# Altium PCB pcb.PcbDoc (part 1 of 2)
Units mil, origin at the board's own origin, x right, y up, seen from the top; angles counter-clockwise.
Board outline 3942.98 x 2092.58 mil, 2 copper layers (Top Layer, Bottom Layer), stack 62.205 mil thick; 140 components, 132 nets, 587 pads, 237 vias.
Unrouted connection lines stored in the file: 2.
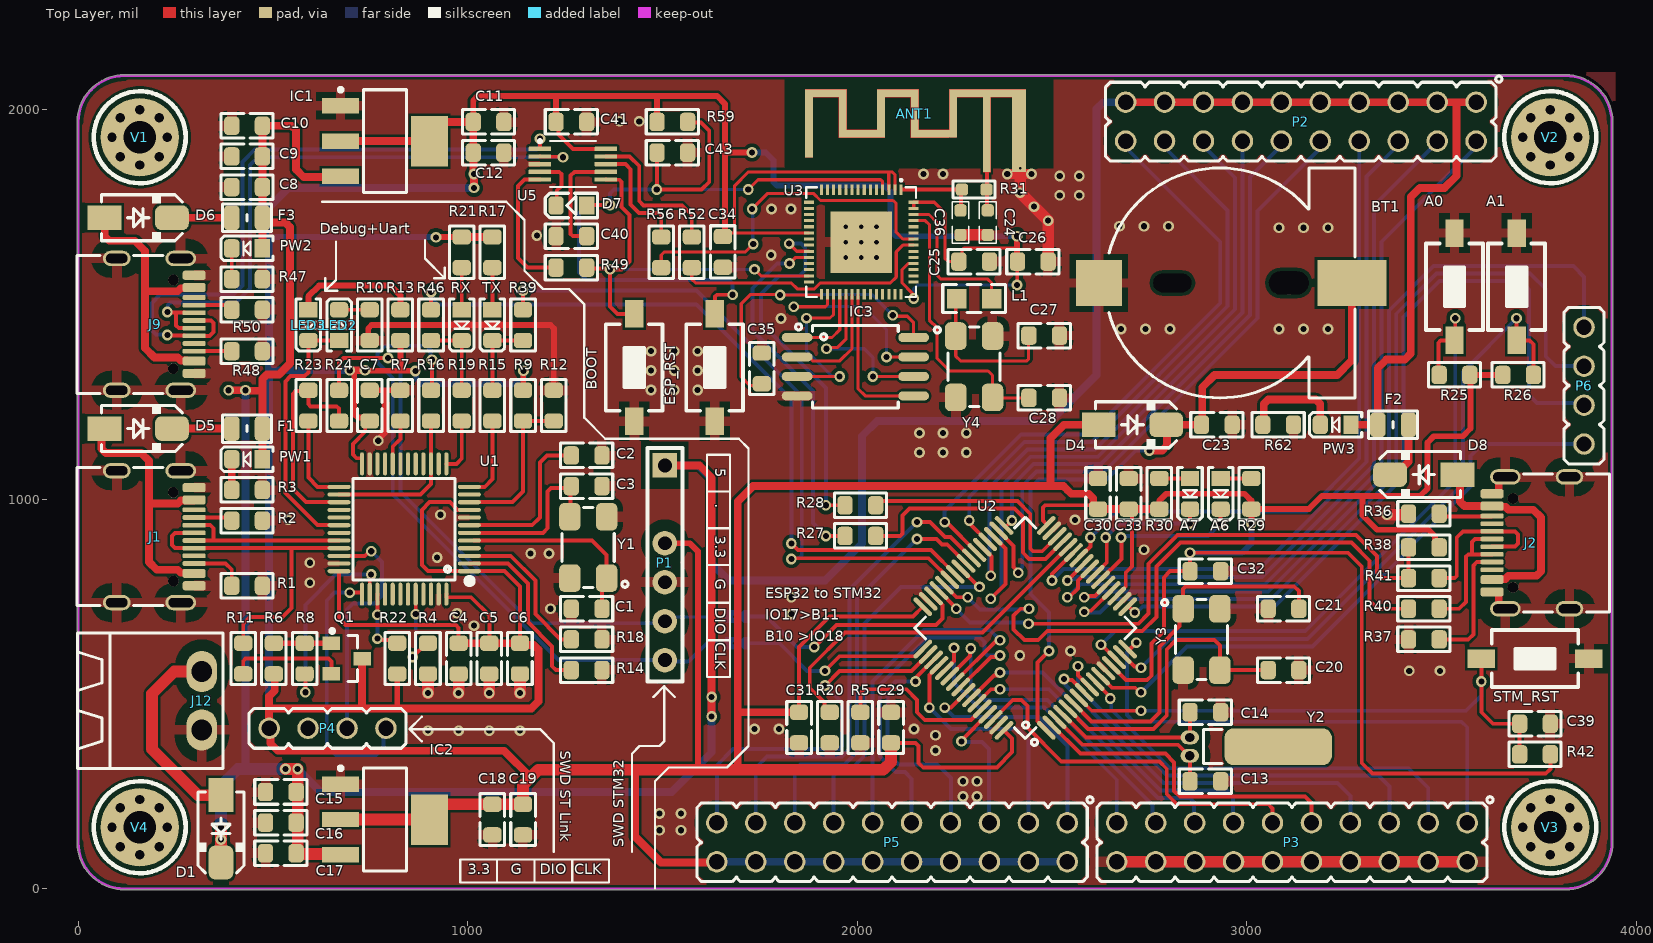
[diagram p0: Top Layer view]
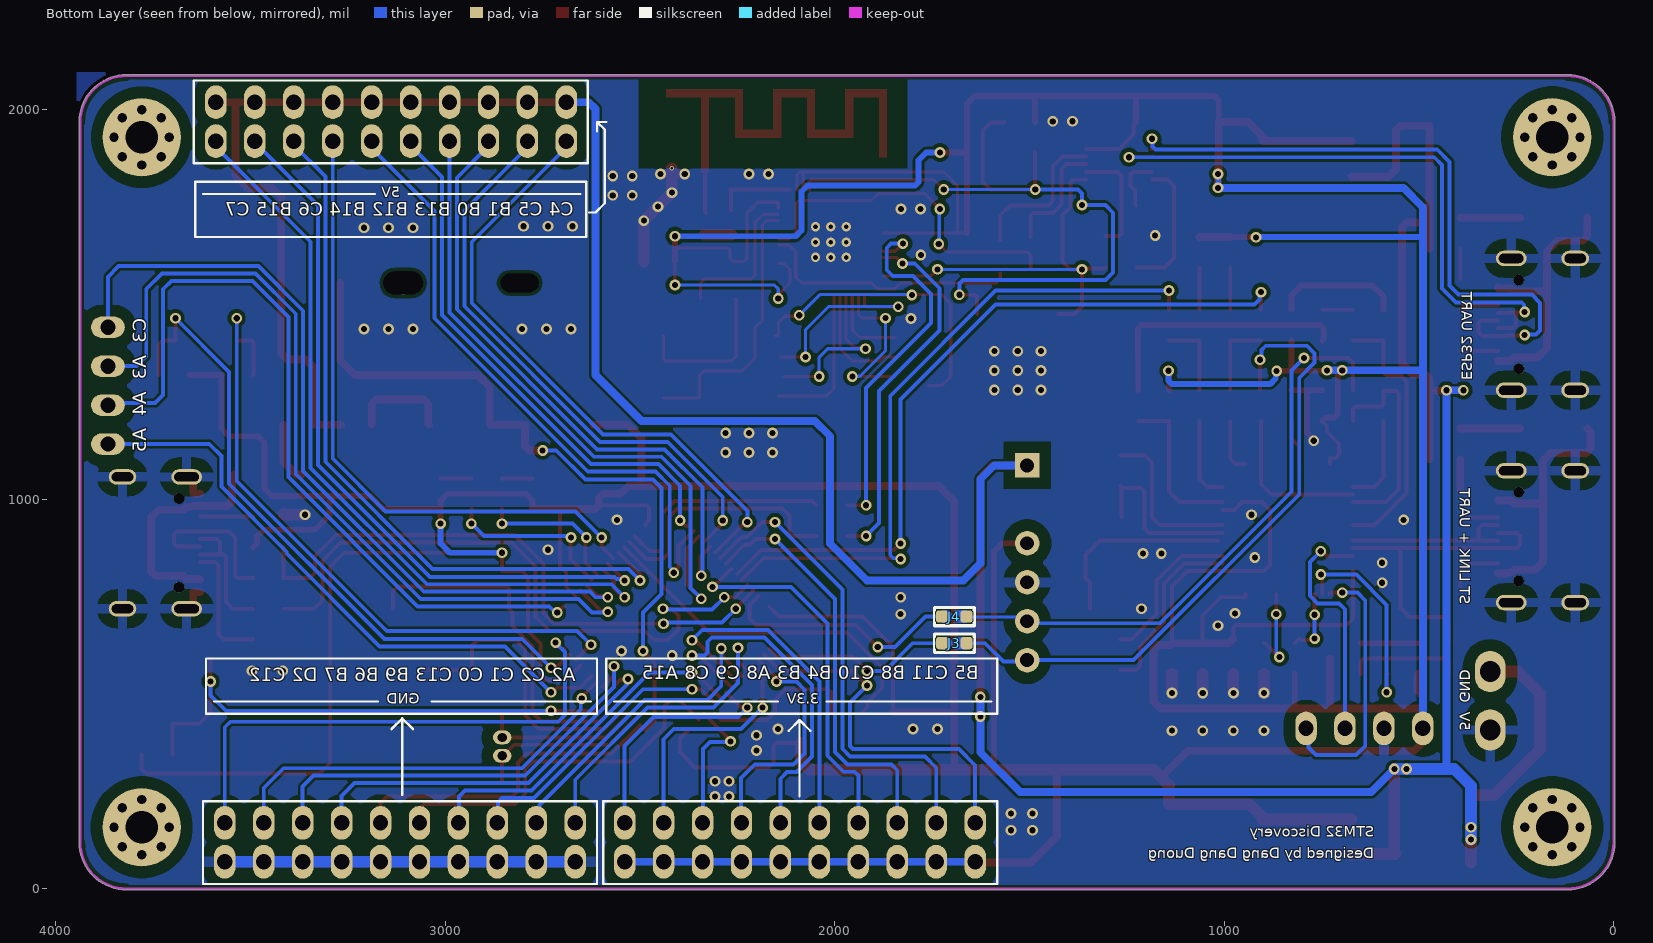
[diagram p1: Bottom Layer view, seen from below]

## Layer stack, top to bottom
Top Solder: solder mask 0.3937, Solder Resist, Dk 3.5
Top Layer: signal copper 1.378
Dielectric 1: dielectric 59.4488, FR-4, Dk 4.8
Bottom Layer: signal copper 1.378
Bottom Solder: solder mask 0.3937, Solder Resist, Dk 3.5

## Board outline
-2.97,118.42 -2.97,1968.19 -2.98,1968.5 cw(c118.11,1968.5) 118.11,2089.6 1722.44,2089.6 1722.75,2089.58 3818.59,2089.58 3818.9,2089.6 cw(c3818.9,1968.5) 3939.99,1968.5 3939.99,118.11 cw(c3818.9,118.11) 3818.9,-2.98 3818.59,-2.97 118.42,-2.97 118.11,-2.98 cw(c118.11,118.11)

## Design rules (kind name [scope] priority, off if disabled: settings)
Clearance "Schematic Clearance Constraint_4" [InComponent('J3')] p1: gap=10 ignorepadtopadclearanceinfootprint=FALSE except(0: Arc-Hole Track-Hole SMDPad-Hole THPad-Hole Via-Hole Fill-Hole Poly-Hole Region-Hole Text-Hole; 5: Region-Region)
Clearance "Schematic Clearance Constraint_3" [InComponent('J4')] p2: gap=10 ignorepadtopadclearanceinfootprint=FALSE except(0: Arc-Hole Track-Hole SMDPad-Hole THPad-Hole Via-Hole Fill-Hole Poly-Hole Region-Hole Text-Hole; 5: Region-Region)
Clearance "Schematic Clearance Constraint_2" [InComponent('J9')] p3: gap=10 ignorepadtopadclearanceinfootprint=TRUE except(0: Arc-Hole Track-Hole SMDPad-Hole THPad-Hole Via-Hole Fill-Hole Poly-Hole Region-Hole Text-Hole; 5: Arc-Arc Arc-Track Arc-SMDPad Arc-THPad Track-Track Track-SMDPad Track-THPad SMDPad-SMDPad SMDPad-THPad SMDPad-Fill SMDPad-Poly SMDPad-Region)
Clearance "Schematic Clearance Constraint_1" [InComponent('J2')] p4: gap=10 ignorepadtopadclearanceinfootprint=TRUE except(0: Arc-Hole Track-Hole SMDPad-Hole THPad-Hole Via-Hole Fill-Hole Poly-Hole Region-Hole Text-Hole; 5: Arc-Arc Arc-Track Arc-SMDPad Arc-THPad Track-Track Track-SMDPad Track-THPad SMDPad-SMDPad SMDPad-THPad SMDPad-Fill SMDPad-Poly SMDPad-Region)
Clearance "Schematic Clearance Constraint" [InComponent('J1')] p5: gap=10 ignorepadtopadclearanceinfootprint=TRUE except(0: Arc-Hole Track-Hole SMDPad-Hole THPad-Hole Via-Hole Fill-Hole Poly-Hole Region-Hole Text-Hole; 5: Arc-Arc Arc-Track Arc-SMDPad Arc-THPad Track-Track Track-SMDPad Track-THPad SMDPad-SMDPad SMDPad-THPad SMDPad-Fill SMDPad-Poly SMDPad-Region)
Clearance Clearance_1 [InNetClass('USB')] p6: gap=10 ignorepadtopadclearanceinfootprint=TRUE except(7.99: Track-Track Track-SMDPad; 30: THPad-Poly)
Clearance [All] p7: gap=10 ignorepadtopadclearanceinfootprint=TRUE except(5: Track-Track Track-SMDPad; 7: Track-THPad Track-Via Track-Fill Track-Poly Track-Region Track-Text Track-Hole SMDPad-SMDPad SMDPad-THPad SMDPad-Via SMDPad-Fill SMDPad-Poly SMDPad-Region SMDPad-Text SMDPad-Hole; 9: Poly-Poly Poly-Region Poly-Text Poly-Hole Region-Region Region-Text Region-Hole; 30: THPad-Poly)
Height [All] p1: minheight=0 maxheight=1574.8 prefheight=500
HoleSize [All] p1: absolutevalues=TRUE maxlimit=236.22 minlimit=3.94 maxpercent=80.000 minpercent=20.000
MinimumSolderMaskSliver [All] p1: minsoldermaskwidth=1
PlaneConnect [All] p1: planeconnectstyle=Relief reliefexpansion=20 reliefentries=4 reliefconductorwidth=35 reliefairgap=10
PolygonConnect [All] p1: thpad.connectstyle=Relief thpad.reliefconductorwidth=25 thpad.reliefentries=4 thpad.polygonreliefangle="90 Angle" thpad.airgapwidth=30 smdpad.connectstyle=Relief smdpad.reliefconductorwidth=25 smdpad.reliefentries=4 smdpad.polygonreliefangle="90 Angle" smdpad.airgapwidth=15 via.connectstyle=Relief via.reliefconductorwidth=25 via.reliefentries=4 via.polygonreliefangle="90 Angle" via.airgapwidth=0
RoutingVias [All] p1: holewidth=15.75 width=27.56 viastyle="Through Hole" minholewidth=15.75 minwidth=27.56 maxholewidth=15.75 maxwidth=27.56
SilkToSilkClearance [All] p1: silktosilkclearance=1
SilkToSolderMaskClearance [IsPad] p1: minsilkscreentomaskgap=0 clearancetoexposedcopper=TRUE
SolderMaskExpansion [All] p1: expansion=4 istentingtop=FALSE
SupplyNets "Schematic Supply Nets_2" [InNet('GND')] p1: voltage=0.000
SupplyNets "Schematic Supply Nets_1" [InNet('5V')] p2: voltage=0.000
SupplyNets "Schematic Supply Nets" [InNet('3.3V')] p3: voltage=0.000
UnRoutedNet [All] p1: checkbadconnections=TRUE
Width [All] p1: maxlimit=50 minlimit=7 preferedwidth=10
23 further rules are at their usual default settings.

## Components (designator, comment, footprint, x,y, rotation, side; value= is the part's Value field where it differs from the comment)
A0 "SW-SMD" "SW-SMD 3x6 mm" 3533.46,1545.28 r270 top
A1 "SW-SMD" "SW-SMD 3x6 mm" 3692.91,1545.28 r270 top
A6 "LED BLUE" "LED 0805 Blue" 2933.07,1013.78 r270 top
A7 "LED GREEN" "LED 0805 Green" 2854.33,1013.78 r270 top
ANT1 "2.4 GHz PCB" "2.4 GHZ PCB ANTENA" 2153.54,1952.76 r180 top
BOOT "SW-SMD" "SW-SMD 3x6 mm" 1427.17,1337.95 r270 top
BT1 "CR1220" BTH1220 2982.28,1555.12 r180 top
C1 "10pF" C_0805_SMD 1305.12,718.5 r180 top
C2 "104" C_0805_SMD 1305.12,1112.2 r0 top
C3 "10pF" C_0805_SMD 1305.12,1033.46 r180 top
C4 "104" C_0805_SMD 976.38,590.55 r270 top
C5 "104" C_0805_SMD 1055.12,590.55 r270 top
C6 "104" C_0805_SMD 1133.86,590.55 r270 top
C7 "104" C_0805_SMD 748.03,1240.16 r90 top
C8 "104" C_0805_SMD 433.07,1801.18 r180 top
C9 "10uF/25V" C_0805_SMD 433.07,1879.92 r0 top
C10 "10uF/25V" C_0805_SMD 433.07,1958.66 r0 top
C11 "104" C_0805_SMD 1053.15,1968.5 r0 top
C12 "10uF/25V" C_0805_SMD 1053.15,1889.76 r180 top
C13 "10pF" C_0805_SMD 2893.7,275.59 r180 top
C14 "10pF" C_0805_SMD 2893.7,452.76 r180 top
C15 "104" C_0805_SMD 519.68,248.03 r180 top
C16 "10uF/25V" C_0805_SMD 519.68,169.29 r0 top
C17 "10uF/25V" C_0805_SMD 519.68,90.55 r0 top
C18 "104" C_0805_SMD 1062.99,177.17 r270 top
C19 "10uF/25V" C_0805_SMD 1141.73,177.17 r90 top
C20 "10pF" C_0805_SMD 3094.49,561.02 r0 top
C21 "10pF" C_0805_SMD 3094.49,718.5 r180 top
C23 "10uF/25V" C_0805_SMD 2923.23,1190.94 r180 top
C24 "2.2uF" C_0603_SMD 2335,1710 r90 top
C25 "104" C_0805_SMD 2300,1610 r180 top
C26 "104" C_0805_SMD 2450.63,1610 r180 top
C27 "10pF" C_0805_SMD 2480,1420 r0 top
C28 "10pF" C_0805_SMD 2480,1260 r0 top
C29 "104" C_0805_SMD 2086.61,413.39 r270 top
C30 "104" C_0805_SMD 2618.11,1013.78 r270 top
C31 "104" C_0805_SMD 1850.39,413.39 r90 top
C32 "104" C_0805_SMD 2893.7,814.96 r180 top
C33 "104" C_0805_SMD 2696.85,1013.78 r270 top
C34 "104" C_0805_SMD 1655,1635 r90 top
C35 "104" C_0805_SMD 1755,1335.63 r270 top
C36 "2.2uF" C_0603_SMD 2265,1710 r90 top
C39 "104" C_0805_SMD 3740.16,423.23 r180 top
C40 "104" C_0805_SMD 1265.75,1675.2 r0 top
C41 "104" C_0805_SMD 1265.75,1968.5 r180 top
C43 "1uF/50V" C_0805_SMD 1525,1889.76 r180 top
D1 "SS34" D_SMA 366.14,153.54 r270 top
D4 "SS34" D_SMA 2706.69,1190.94 r0 top
D5 "SS34" D_SMA 153.54,1181.1 r0 top
D6 "SS34" D_SMA 153.54,1722.44 r0 top
D7 "1N4148" D_SOD323 1265.75,1753.94 r180 top
D8 "SS34" D_SMA 3454.72,1062.99 r180 top
ESP_RST "SW-SMD" "SW-SMD 3x6 mm" 1633.86,1337.95 r270 top
F1 "0805L050WR" F0805 433.07,1181.1 r0 top
F2 "0805L050WR" F0805 3375.98,1190.94 r180 top
F3 "0805L050WR" F0805 433.07,1722.44 r0 top
IC1 "AMS1117" SOT223-4N 787.4,1919.29 r0 top
IC2 "AMS1117" SOT223-4N 787.4,177.17 r0 top
IC3 "W25Q128JV" SO_8_W 1995,1340 r0 top
J1 "USB C 3.1" USBC_SMD_16_USB4105 287.4,903.54 r90 top
J2 "USB C 3.1" USBC_SMD_16_USB4105 3639.76,887.8 r270 top
J3 "Jump" JP_0603 1692.91,630.18 r0 bottom
J4 "Jump" JP_0603 1692.91,698.45 r0 bottom
J9 "USB C 3.1" USBC_SMD_16_USB4105 287.4,1448.82 r90 top
J12 "KF3.81-2P" "CONN KF-3.81-2-R" 187.01,482.28 r90 top
L1 "4.7uH" "L 0805" 2300,1515 r180 top
LED2 "LED BLUE" "LED 0805 Blue" 669.29,1446.85 r90 top
LED3 "LED GREEN" "LED 0805 Green" 590.55,1446.85 r270 top
P1 "Nuvoton" "Header Code Nuvoton 2.54 6P" 1505.91,836.61 r270 top
P2 "HDR-M-2x10" HDR_M_2X10 3138.98,1969.29 r180 top
P3 "HDR-M-2x10" HDR_M_2X10 3116.14,118.9 r180 top
P4 "HDR-M-4P" HDR_M_1X4 639.76,411.42 r180 top
P5 "HDR-M-2x10" HDR_M_2X10 2089.37,118.9 r180 top
P6 "HDR-M-4P" HDR_M_1X4 3866.14,1291.34 r90 top
PW1 "LED RED" "LED 0805 Red" 433.07,1102.36 r180 top
PW2 "LED RED" "LED 0805 Red" 433.07,1643.7 r180 top
PW3 "LED RED" "LED 0805 Red" 3228.35,1190.94 r180 top
Q1 "3904" "SOT23_N NXP" 688.98,590.55 r0 top
R1 "5.1K" RES-SMD-0805 433.07,777.56 r0 top
R2 "5.1K" RES-SMD-0805 433.07,944.88 r0 top
R3 "10K" RES-SMD-0805 433.07,1023.62 r0 top
R4 "10K" RES-SMD-0805 897.64,590.55 r270 top
R5 "10K" RES-SMD-0805 2007.87,413.39 r270 top
R6 "10K" RES-SMD-0805 501.97,590.55 r90 top
R7 "10K" RES-SMD-0805 826.77,1240.16 r90 top
R8 "100R" RES-SMD-0805 580.71,590.55 r270 top
R9 "5.1K" RES-SMD-0805 1141.73,1240.16 r90 top
R10 "5.1K" RES-SMD-0805 748.03,1446.85 r270 top
R11 "1.5k" RES-SMD-0805 423.23,590.55 r90 top
R12 "5.1K" RES-SMD-0805 1220.47,1240.16 r90 top
R13 "5.1K" RES-SMD-0805 826.77,1446.85 r270 top
R14 "10K" RES-SMD-0805 1305.12,561.02 r0 top
R15 "33R" RES-SMD-0805 1062.99,1240.16 r270 top
R16 "33R" RES-SMD-0805 905.51,1240.16 r270 top
R17 "5.1K" RES-SMD-0805 1062.99,1633.86 r270 top
R18 "10K" RES-SMD-0805 1305.12,639.76 r0 top
R19 "33R" RES-SMD-0805 984.25,1240.16 r270 top
R20 "10K" RES-SMD-0805 1929.13,413.39 r270 top
R21 "5.1K" RES-SMD-0805 984.25,1633.86 r270 top
R22 "10K" RES-SMD-0805 818.9,590.55 r270 top
R23 "100R" RES-SMD-0805 590.55,1240.15 r270 top
R24 "33R" RES-SMD-0805 669.29,1240.16 r270 top
R25 "4.7K" RES-SMD-0805 3533.46,1318.9 r180 top
R26 "4.7K" RES-SMD-0805 3696.85,1318.9 r0 top
R27 "33R" RES-SMD-0805 2007.87,905.51 r0 top
R28 "33R" RES-SMD-0805 2007.87,984.25 r0 top
R29 "2.2k" RES-SMD-0805 3011.81,1013.78 r90 top
R30 "2.2k" RES-SMD-0805 2775.59,1013.78 r90 top
R31 "1M" RES-SMD-0603 2300,1795 r0 top
R36 "5.1K" RES-SMD-0805 3454.73,962.6 r180 top
R37 "5.1K" RES-SMD-0805 3454.72,639.76 r180 top
R38 "1.5k" RES-SMD-0805 3454.72,875.98 r180 top
R39 "33R" RES-SMD-0805 1141.73,1446.85 r270 top
R40 "33R" RES-SMD-0805 3454.72,718.5 r0 top
R41 "33R" RES-SMD-0805 3454.72,797.24 r0 top
R42 "4.7K" RES-SMD-0805 3740.16,344.49 r180 top
R46 "33R" RES-SMD-0805 905.51,1446.85 r90 top
R47 "10K" RES-SMD-0805 433.07,1564.96 r0 top
R48 "5.1K" RES-SMD-0805 433.07,1486.22 r180 top
R49 "33R" RES-SMD-0805 1265.75,1594.49 r180 top
R50 "5.1K" RES-SMD-0805 433.07,1379.92 r180 top
R52 "499R" RES-SMD-0805 1575.43,1633.86 r90 top
R56 "499R" RES-SMD-0805 1496.69,1633.86 r90 top
R59 "10K" RES-SMD-0805 1525,1968.5 r180 top
R62 "10K" RES-SMD-0805 3080.71,1190.94 r0 top
RX "LED BLUE" "LED 0805 Blue" 984.25,1446.85 r270 top
STM_RST "SW-SMD" "SW-SMD 3x6 mm" 3740.16,590.55 r180 top
TX "LED GREEN" "LED 0805 Green" 1062.99,1446.85 r270 top
U1 "STM32F103CBT6" LQFP-48_L7.0-W7.0-P0.50-LS9.0-BL 836.61,923.23 r90 top
U2 "STM32F103RCT6" QFG50_64 2431.1,669.29 r135 top
U3 "ESP32-S3(R8)" QFN-56_L7.0-W7.0-P0.40-TL-EP4.0 2010,1660 r270 top
U5 "CH340X" VSSOP-10 1269.69,1860.24 r0 top
V1 "Vit m2" "Screw 2mm - VIA" 157.48,1929.13 r0 top locked
V2 "Vit m2" "Screw 2mm - VIA" 3779.53,1929.13 r0 top locked
V3 "Vit m2" "Screw 2mm - VIA" 3779.53,157.48 r0 top locked
V4 "Vit m2" "Screw 2mm - VIA" 157.48,157.48 r0 top locked
Y1 "8Mhz" XTL_4_5032 1309.05,875.98 r180 top
Y2 "32.768kHz" XTLT_RTC 2853.83,364.62 r270 top
Y3 "8Mhz" XTL_4_5032 2883.86,639.76 r0 top
Y4 "20Mhz" XTL_4_5032 2300,1340 r0 top

## Footprints (in the part's own frame and the unit in brackets; to place one, negate y for a bottom-side part, rotate by r counter-clockwise, add the part's x,y. Pads: shape width x height; smd on the part's side, far side on the other; paste and mask are expansions set on the pad)
"2.4 GHZ PCB ANTENA" [mm]
  rect 5x0.5 smd paste+0.102: 1(-4.6,-2.275)
  rect 0.5x4.9 smd paste+0.102: 1(-4.55,0.425)
  rect 0.5x2.64 smd paste+0.102: 1(-2.35,-0.705) 1(0.15,-0.705) 1(2.35,-0.705) 1(4.85,-0.705)
  rect 2x0.5 smd paste+0.102: 1(-1.1,0.365) 1(3.6,0.365)
  rect 2.7x0.5 smd paste+0.102: 1(1.25,-2.275) 1(5.95,-2.275)
  rect 0.5x3.94 smd paste+0.102: 1(7.05,-0.055)
  rect 0.9x4.9 smd paste+0.102: 2(-6.65,0.425)
  Top Layer region: -2.1,-2.025 -2.1,-2.525 -7.1,-2.525 -7.1,-2.025 -4.8,-2.025 -4.8,2.875 -4.3,2.875 -4.3,-2.025 -2.6,-2.025 -2.6,0.615 -2.1,0.615 -2.1,0.615 -0.1,0.615 -0.1,0.115 -2.1,0.115 -2.1,-2.025
  Top Layer region: -2.1,-2.025 -2.1,-2.525 -7.1,-2.525 -7.1,-2.025 -4.8,-2.025 -4.8,2.875 -4.3,2.875 -4.3,-2.025 -2.6,-2.025 -2.6,0.615 -2.1,0.615 -2.1,0.615 -0.1,0.615 -0.1,0.115 -2.1,0.115 -2.1,-2.025
  Top Layer region: -2.1,-2.025 -2.1,-2.525 -7.1,-2.525 -7.1,-2.025 -4.8,-2.025 -4.8,2.875 -4.3,2.875 -4.3,-2.025 -2.6,-2.025 -2.6,0.615 -2.1,0.615 -2.1,0.615 -0.1,0.615 -0.1,0.115 -2.1,0.115 -2.1,-2.025
  Top Layer region: -2.1,-2.025 -2.1,-2.525 -7.1,-2.525 -7.1,-2.025 -4.8,-2.025 -4.8,2.875 -4.3,2.875 -4.3,-2.025 -2.6,-2.025 -2.6,0.615 -2.1,0.615 -2.1,0.615 -0.1,0.615 -0.1,0.115 -2.1,0.115 -2.1,-2.025
  Top Layer region: -2.1,-2.025 -2.1,-2.525 -7.1,-2.525 -7.1,-2.025 -4.8,-2.025 -4.8,2.875 -4.3,2.875 -4.3,-2.025 -2.6,-2.025 -2.6,0.615 -2.1,0.615 -2.1,0.615 -0.1,0.615 -0.1,0.115 -2.1,0.115 -2.1,-2.025
  Top Layer region: 2.6,-2.025 2.6,-2.525 -0.1,-2.525 -0.1,-2.025 -0.1,0.615 0.4,0.615 0.4,-2.025 2.1,-2.025 2.1,0.615 2.6,0.615 2.6,0.615 4.6,0.615 4.6,0.115 2.6,0.115 2.6,-2.025
  Top Layer region: 2.6,-2.025 2.6,-2.525 -0.1,-2.525 -0.1,-2.025 -0.1,0.615 0.4,0.615 0.4,-2.025 2.1,-2.025 2.1,0.615 2.6,0.615 2.6,0.615 4.6,0.615 4.6,0.115 2.6,0.115 2.6,-2.025
  Top Layer region: 7.3,-2.025 7.3,-2.525 4.6,-2.525 4.6,-2.025 4.6,-2.025 4.6,0.615 5.1,0.615 5.1,-2.025 6.8,-2.025 6.8,1.915 7.3,1.915 7.3,-2.025
  Top Layer region: 2.6,-2.025 2.6,-2.525 -0.1,-2.525 -0.1,-2.025 -0.1,0.615 0.4,0.615 0.4,-2.025 2.1,-2.025 2.1,0.615 2.6,0.615 2.6,0.615 4.6,0.615 4.6,0.115 2.6,0.115 2.6,-2.025
  Top Layer region: 2.6,-2.025 2.6,-2.525 -0.1,-2.525 -0.1,-2.025 -0.1,0.615 0.4,0.615 0.4,-2.025 2.1,-2.025 2.1,0.615 2.6,0.615 2.6,0.615 4.6,0.615 4.6,0.115 2.6,0.115 2.6,-2.025
  Top Layer region: 7.3,-2.025 7.3,-2.525 4.6,-2.525 4.6,-2.025 4.6,-2.025 4.6,0.615 5.1,0.615 5.1,-2.025 6.8,-2.025 6.8,1.915 7.3,1.915 7.3,-2.025
  Top Layer region: 2.6,-2.025 2.6,-2.525 -0.1,-2.525 -0.1,-2.025 -0.1,0.615 0.4,0.615 0.4,-2.025 2.1,-2.025 2.1,0.615 2.6,0.615 2.6,0.615 4.6,0.615 4.6,0.115 2.6,0.115 2.6,-2.025
BTH1220 [mm] "COIN CELL BATTERY HOLDER 1220 12mm"
  rect 4.5x3 smd: 1(-7.3,0)
  rect 3x3 smd: 2(9.2,0)
  round 1.5 hole 1.5 slot 2.6 at 0 deg unplated: ""(-3.2,0)
  round 1 hole 1.2 slot 2.5 at 0 deg unplated: ""(4.4,0)
  silkscreen extent -7.5,-7.5 8.54,7.5, body extent -8.5,-7.4 10.3,7.35, height 4.26
C_0603_SMD [mm]
  rrect50% 0.8x0.8 smd mask+0.075: 1(-0.8,0) 2(0.8,0)
  Top Layer pour cut-out: -0.517,0.654 0.483,0.654 0.483,-0.654 -0.517,-0.654
  silkscreen extent -1.35,-0.55 1.35,0.55, body extent -0.82,-0.4 0.78,0.4, height 0.9
C_0805_SMD [mm]
  rrect50% 1x1.2 smd: 1(-1,0) 2(1,0)
  Top Layer pour cut-out: -0.5,0.8 0.5,0.8 0.5,-0.8 -0.5,-0.8
  silkscreen extent -1.7,-0.8 1.7,0.8, body extent -1,-0.63 1,0.62, height 1
"CONN KF-3.81-2-R" [mm] "FCI Pluggable Terminal Block"
  oval 2.7x2 hole 1.35: 1(-1.905,-3.302) 2(1.905,-3.302)
  silkscreen extent -4.43,-4.68 4.43,4.8, body extent -4.31,-4.6 4.31,14.2, height 7.8
D_SMA [mm] "SMA Molded Diode, 2-Leads, Body 4.3x2.7mm, SOD-128"
  rect 2.2x1.6 smd: 1(-2.2,0)
  rrect50% 2.2x1.6 smd: 2(2.2,0)
  silkscreen extent -2.4,-1.5 2.88,1.5, body extent -2.75,-1.4 2.75,1.4, height 2.6
D_SOD323 [mm] "DIODE0805, SOD-323, SC-76, DL-35, 0805 similar size"
  rect 1x1.2 smd mask+0.075: 1(-1,0)
  rrect50% 1x1.2 smd mask+0.075: 2(1,0)
  Top Layer pour cut-out: -0.5,0.8 0.5,0.8 0.5,-0.8 -0.5,-0.8
  silkscreen extent -1.7,-0.8 1.7,0.8, body extent -1.25,-0.68 1.25,0.67, height 1
F0805 [mm] "FUSE FAST 500mA, 0805, 2012, 2.0X1.3mm"
  rrect50% 1x1.6 smd paste-0.1 mask+0.075: 1(-1,0) 2(1,0)
  Top Layer pour cut-out: -0.5,0.8 0.5,0.8 0.5,-0.8 -0.5,-0.8
  silkscreen extent -1.6,-0.9 1.6,0.9, body extent -1.1,-0.75 1.1,0.75, height 1.24
HDR_M_1X4 [mm] "Connector; Header; 2 Position"
  round 1.4 / inner round 1.4 / far side oval 1.4x2.2 hole 1 mask+0.1: 1(-3.81,0) 2(-1.27,0) 3(1.27,0) 4(3.81,0)
  silkscreen extent -5.11,-1.3 5.11,1.3, body extent -5.08,-1.25 4.98,1.25, height 8.72
HDR_M_2X10 [mm] "Male Header 2X10 with 2.54 mm Pitch"
  round 1.4 / inner round 1.4 / far side oval 1.4x2.2 hole 1: 1(-11.43,-1.27) 2(-11.43,1.27) 3(-8.89,-1.27) 4(-8.89,1.27) 5(-6.35,-1.27) 6(-6.35,1.27) 7(-3.81,-1.27) 8(-3.81,1.27) 9(-1.27,-1.27) 10(-1.27,1.27) 11(1.27,-1.27) 12(1.27,1.27) 13(3.81,-1.27) 14(3.81,1.27) 15(6.35,-1.27) 16(6.35,1.27) 17(8.89,-1.27) 18(8.89,1.27) 19(11.43,-1.27) 20(11.43,1.27)
  silkscreen extent -13.11,-2.97 12.73,2.57, body extent -12.7,-2.54 12.7,2.54, height 8.5
"Header Code Nuvoton 2.54 6P" [mm]
  rect 1.6x1.6 hole 0.9: 1(-6.35,0)
  round 1.6 on Top Overlay: 2(-3.81,0)
  round 1.6 hole 0.9: 3(-1.27,0) 4(1.27,0) 5(3.81,0) 6(6.35,0)
  silkscreen extent -7.49,-1.14 7.75,1.14
JP_0603 [mm] "CHIP Resistor 1/10 WATT, 1.6x0.8mm, 0603, 1608"
  rrect50% 0.8x0.8 smd paste-3 mask+0.05: 1(-0.8,0) 2(0.8,0)
  Top Layer region: 0.4,0.4 0,0 0.4,-0.4 0.8,-0.4 0.8,0.4
  Top Layer region: -0.8,0.4 0.044,0.4 -0.356,0 0.044,-0.4 -0.8,-0.4
  silkscreen extent -1.32,-0.6 1.32,0.6
"L 0805" [mil]
  rect 50x50 smd: 1(-45,0) 2(45,0)
  silkscreen extent -81,-36 81,36, body extent -39,-24 39,24, height 35
"LED 0805 Blue" [mm]
  rect 1x1.2 smd: 1(-1,0)
  rrect50% 1x1.2 smd: 2(1,0)
  silkscreen extent -1.7,-0.8 1.7,0.8, body extent -1,-0.63 1,0.63, height 0.9
"LED 0805 Green" [mm]
  rect 1x1.2 smd: 1(-1,0)
  rrect50% 1x1.2 smd: 2(1,0)
  silkscreen extent -1.7,-0.8 1.7,0.8, body extent -1,-0.63 1,0.63, height 0.9
"LED 0805 Red" [mm]
  rect 1x1.2 smd: 1(-1,0)
  rrect50% 1x1.2 smd: 2(1,0)
  silkscreen extent -1.7,-0.8 1.7,0.8, body extent -1,-0.63 1,0.63, height 0.9
LQFP-48_L7.0-W7.0-P0.50-LS9.0-BL [mm]
  oval 0.27x1.5 smd paste+0 mask+0.05: 1(-2.75,-4.25) 2(-2.25,-4.25) 3(-1.75,-4.25) 4(-1.25,-4.25) 5(-0.75,-4.25) 6(-0.25,-4.25) 7(0.25,-4.25) 8(0.75,-4.25) 9(1.25,-4.25) 10(1.75,-4.25) 11(2.25,-4.25) 12(2.75,-4.25) 25(2.75,4.25) 26(2.25,4.25) 27(1.75,4.25) 28(1.25,4.25) 29(0.75,4.25) 30(0.25,4.25) 31(-0.25,4.25) 32(-0.75,4.25) 33(-1.25,4.25) 34(-1.75,4.25) 35(-2.25,4.25) 36(-2.75,4.25)
  oval 1.5x0.27 smd paste+0 mask+0.05: 13(4.25,-2.75) 14(4.25,-2.25) 15(4.25,-1.75) 16(4.25,-1.25) 17(4.25,-0.75) 18(4.25,-0.25) 19(4.25,0.25) 20(4.25,0.75) 21(4.25,1.25) 22(4.25,1.75) 23(4.25,2.25) 24(4.25,2.75) 37(-4.25,2.75) 38(-4.25,2.25) 39(-4.25,1.75) 40(-4.25,1.25) 41(-4.25,0.75) 42(-4.25,0.25) 43(-4.25,-0.25) 44(-4.25,-0.75) 45(-4.25,-1.25) 46(-4.25,-1.75) 47(-4.25,-2.25) 48(-4.25,-2.75)
  silkscreen extent -3.59,-4.46 3.3,3.34, body extent -4.5,-4.5 4.5,4.5, height 1.6
QFG50_64 [mm] "A64 (CYPRESS), TQFP64, LQFP64, VQ44, VQG44, 10X10mm, Pitch: 0.5mm"
  oval 1.6x0.3 smd mask+0.05: 1(-5.7,3.75) 2(-5.7,3.25) 3(-5.7,2.75) 4(-5.7,2.25) 5(-5.7,1.75) 6(-5.7,1.25) 7(-5.7,0.75) 8(-5.7,0.25) 9(-5.7,-0.25) 10(-5.7,-0.75) 11(-5.7,-1.25) 12(-5.7,-1.75) 13(-5.7,-2.25) 14(-5.7,-2.75) 15(-5.7,-3.25) 16(-5.7,-3.75) 33(5.7,-3.75) 34(5.7,-3.25) 35(5.7,-2.75) 36(5.7,-2.25) 37(5.7,-1.75) 38(5.7,-1.25) 39(5.7,-0.75) 40(5.7,-0.25) 41(5.7,0.25) 42(5.7,0.75) 43(5.7,1.25) 44(5.7,1.75) 45(5.7,2.25) 46(5.7,2.75) 47(5.7,3.25) 48(5.7,3.75)
  oval 0.3x1.6 smd mask+0.05: 17(-3.75,-5.7) 18(-3.25,-5.7) 19(-2.75,-5.7) 20(-2.25,-5.7) 21(-1.75,-5.7) 22(-1.25,-5.7) 23(-0.75,-5.7) 24(-0.25,-5.7) 25(0.25,-5.7) 26(0.75,-5.7) 27(1.25,-5.7) 28(1.75,-5.7) 29(2.25,-5.7) 30(2.75,-5.7) 31(3.25,-5.7) 32(3.75,-5.7) 49(3.75,5.7) 50(3.25,5.7) 51(2.75,5.7) 52(2.25,5.7) 53(1.75,5.7) 54(1.25,5.7) 55(0.75,5.7) 56(0.25,5.7) 57(-0.25,5.7) 58(-0.75,5.7) 59(-1.25,5.7) 60(-1.75,5.7) 61(-2.25,5.7) 62(-2.75,5.7) 63(-3.25,5.7) 64(-3.75,5.7)
  silkscreen extent -5.9,-5.1 5.1,5.1, body extent -6,-6 6,6, height 1.6
QFN-56_L7.0-W7.0-P0.40-TL-EP4.0 [mm]
  rect 0.665x0.2 smd paste-100 mask+0.051: 1(-3.408,2.6) 2(-3.408,2.2) 3(-3.408,1.8) 4(-3.408,1.4) 5(-3.408,1) 6(-3.408,0.6) 7(-3.408,0.2) 8(-3.408,-0.2) 9(-3.408,-0.6) 10(-3.408,-1) 11(-3.408,-1.4) 12(-3.408,-1.8) 13(-3.408,-2.2) 14(-3.408,-2.6) 29(3.407,-2.6) 30(3.407,-2.2) 31(3.407,-1.8) 32(3.407,-1.4) 33(3.407,-1) 34(3.407,-0.6) 35(3.407,-0.2) 36(3.407,0.2) 37(3.407,0.6) 38(3.407,1) 39(3.407,1.4) 40(3.407,1.8) 41(3.407,2.2) 42(3.407,2.6)
  rect 0.2x0.665 smd paste-100 mask+0.051: 15(-2.6,-3.407) 16(-2.2,-3.407) 17(-1.8,-3.407) 18(-1.4,-3.407) 19(-1,-3.407) 20(-0.6,-3.407) 21(-0.2,-3.407) 22(0.2,-3.407) 23(0.6,-3.407) 24(1,-3.407) 25(1.4,-3.407) 26(1.8,-3.407) 27(2.2,-3.407) 28(2.6,-3.407) 43(2.6,3.408) 44(2.2,3.408) 45(1.8,3.408) 46(1.4,3.408) 47(1,3.408) 48(0.6,3.408) 49(0.2,3.408) 50(-0.2,3.408) 51(-0.6,3.408) 52(-1,3.408) 53(-1.4,3.408) 54(-1.8,3.408) 55(-2.2,3.408) 56(-2.6,3.408)
  rect 4x4 smd paste-100 mask+0.051: 57(0,0)
  silkscreen extent -4.11,-3.58 3.58,3.58
RES-SMD-0603 [mm]
  rrect50% 0.8x0.8 smd: 1(-0.8,0)
  rrect50% 0.8x0.8 smd mask+0.075: 2(0.8,0)
  Top Layer pour cut-out: -0.5,0.48 0.5,0.48 0.5,-0.474 -0.5,-0.474
  silkscreen extent -1.37,-0.55 1.35,0.55, body extent -0.82,-0.4 0.78,0.4, height 0.43
RES-SMD-0805 [mm]
  rrect50% 1x1.2 smd paste-0.1 mask+0.075: 1(-1,0) 2(1,0)
  Top Layer pour cut-out: -0.5,0.697 0.5,0.697 0.5,-0.713 -0.5,-0.713
  silkscreen extent -1.7,-0.8 1.7,0.8, body extent -1.15,-0.67 1.15,0.67, height 0.76
"Screw 2mm - VIA" [mm] "Hole 2.1mm"
  round 5.1 hole 2.1 mask+0.1: 1(0,0)
  Top Layer pour cut-out: 0,-3 -1.148,-2.772 -2.121,-2.121 -2.772,-1.148 -3,0 -3,0 -2.772,1.148 -2.121,2.121 -1.148,2.772 0,3 0,3 1.148,2.772 2.121,2.121 2.772,1.148 3,0 3,0 2.772,-1.148 2.121,-2.121 1.148,-2.772 0,-3
  Bottom Layer pour cut-out: 0,-3 -1.148,-2.772 -2.121,-2.121 -2.772,-1.148 -3,0 -3,0 -2.772,1.148 -2.121,2.121 -1.148,2.772 0,3 0,3 1.148,2.772 2.121,2.121 2.772,1.148 3,0 3,0 2.772,-1.148 2.121,-2.121 1.148,-2.772 0,-3
  silkscreen extent -3,-3 3,3, body extent -2,-2 2,2, height 1.73
SO_8_W [mm] "SOIC Width, 5x5.3mm body 1.27mm pitch, 5.28mm SOIJ"
  oval 2x0.6 smd: 1(-3.8,1.905) 2(-3.8,0.635) 3(-3.8,-0.635) 4(-3.8,-1.905) 5(3.8,-1.905) 6(3.8,-0.635) 7(3.8,0.635) 8(3.8,1.905)
  silkscreen extent -3.9,-2.7 2.8,2.8, body extent -4.05,-2.73 4.05,2.73, height 1.75
"SOT23_N NXP" [mil] "SOT23, 3-Leads, Body 3x1.4mm, Pitch 0.95mm, IPC Medium Density"
  rect 45x35 smd: 1(-39.37,39.37) 2(-39.37,-39.37) 3(39.37,0)
  silkscreen extent -42,-59 28,76, body extent -50,-59 50,59, height 39
SOT223-4N [mm] "SOT223, 4-Leads, Body 6.5x3.5mm, Pitch 2.3mm, Lead Span 7mm, IPC Medium Density"
  rect 2.4x1 smd: 1(-2.9,2.3) 2(-2.9,0) 3(-2.9,-2.3)
  rect 2.4x3.3 smd: 4(2.9,0)
  silkscreen extent -3.02,-3.35 1.4,3.47, body extent -3.39,-3.27 3.5,3.23, height 1.72
"SW-SMD 3x6 mm" [mm] "Switch SMD type"
  rect 1.8x1.2 smd: 1(-3.5,0) 2(3.5,0)
  silkscreen extent -2.82,-1.85 2.82,1.85, body extent -3.05,-1.85 3.05,1.85, height 2.5
USBC_SMD_16_USB4105 [mm] "CONN, USB, Type C, USB4105, popular*"
  rrect50% 0.6x1.5 smd mask+0.075: A1B12(3.2,-0.25) A4B9(2.4,-0.25) B1A12(-3.2,-0.25) B4A9(-2.4,-0.25)
  rrect50% 0.3x1.5 smd mask+0.075: A5(1.25,-0.25) A6(0.25,-0.25) A7(-0.25,-0.25) A8(-1.25,-0.25) B5(-1.75,-0.25) B6(-0.75,-0.25) B7(0.75,-0.25) B8(1.75,-0.25)
  oval 1x1.8 hole 0.6 slot 1.4 at 90 deg: SH1(-4.3,4.8) SH2(4.3,4.8)
  oval 1x2 hole 0.6 slot 1.6 at 90 deg: SH3(-4.3,0.62) SH4(4.3,0.62)
  round 0.7 hole 0.7 unplated: ""(-2.89,1.12) ""(2.89,1.12)
  silkscreen extent -4.5,1.8 4.5,7.4, body extent -4.79,-0.3 4.79,7.41, height 3.26
VSSOP-10 [mm]
  rrect25% 1.47x0.28 smd: 1(-2.151,0.995) 2(-2.151,0.495) 3(-2.151,-0.005) 4(-2.151,-0.505) 5(-2.151,-1.005) 6(2.149,-1.005) 7(2.149,-0.505) 8(2.149,-0.005) 9(2.149,0.495) 10(2.149,0.995)
  silkscreen extent -2.25,-1.51 1.5,1.59, body extent -2.45,-1.51 2.45,1.49, height 1.1
XTL_4_5032 [mm] "ASFLMB, CDFN-4"
  rrect50% 1.4x1.8 smd: 1(-1.2,2) 2(-1.2,-2) 3(1.2,-2) 4(1.2,2)
  Top Layer pour cut-out: -1.6,1.8 -1.6,-1.8 1.6,-1.8 1.6,1.8
  silkscreen extent -2.6,-2.6 1.7,2.6, body extent -1.6,-2.5 1.6,2.5, height 1.55
XTLT_RTC [mm] "CRYSTAL RTC SLEEP, AB26T"
  oval 0.9x1.2 hole 0.6 mask+0.1: 1(-0.6,0) 2(0.6,0)
  rrect50% 2.4x7 smd: 3(0.011,5.763)
  silkscreen extent -1.1,0.9 1.1,2.1, body extent -1,-0.1 1,7.04, height 1.99

## Part data
A0 A1 BOOT ESP_RST STM_RST: library part "SW2 SMD 3x6", "Button 3x6 mm x 2.5mm 2Pin SMD", Code=3606-006
A6 LED2 RX: library part "LED 0805 BLUE", "LED 0805 SMD BLUE", Code=8600-019, Designed by=TranLuyen
A7 LED3 TX: library part "LED 0805 GREEN", "LED 0805 SMD GREEN", Code=8600-027, Designed by=TranLuyen
BT1: library part BATH_CR1220, "BATTERY HOLDER, CR1220 SMD", Code=11008-012, Code_sub1=10101-015, ComponentLink1Description=Links, ComponentLink1URL=https://dientutuonglai.com/san-pham/?keyword=11008-012&group_product=, Designed by=TranLuyen
C1 C3 C13 C14 C20 C21 C27 C28: library part "Cap 0805 10pF 50V", "Cap SMD 0805", Code=1438-018
C2 C4 C5 C6 C7 C8 C11 C15 C18 C25 C26 C29 C30 C31 C32 C33 C34 C35 C39 C40 C41: library part "Cap 0805 104 100nF", "Cap SMD 0805 104-100nF-0.1uF 50V", Code=1438-080
C9 C10 C12 C16 C17 C19 C23: library part "Cap 0805 10uF 25V", "Cap SMD 0805 10uF", Code=1436-100
C24 C36: library part "Cap 0603 2.2uF 50V", "Cap SMD 0603", Code=1451-094
C43: library part "Cap 0805 1uF 50V", "Cap SMD 0805 105 - 1uF 50V", Code=1438-092
D1 D4 D5 D6 D8: library part SS34-SMA, "Surface-Mount Schottky Barrier Rectifier", Code=2005-008
D7: library part "1N4148WS - T4 SOD-323", "T4-Rectifier Diode Small Signal Switching 100V 0.25A 4ns 2-Pin SOD-323", Code=2001-025
F1 F2 F3: library part "FUSE 0805 500mA", "0805L050WR 0805 6V 500mA", Code=N/A
IC1 IC2: library part "AMS1117-3.3V SOT223", "SOT-223", Code=5102-034
IC3: library part "W25Q128JV SOIC 8 W", "W25Q128JVSSIQ IC Flash 128MBIT", Code=5015-093
J1 J2 J9: library part CONN_USBC_SMD_16_USB4105, "CONN, USB, Type C, USB 2.0, Right-Angle, SMD", Rule="Clearance Constraint [Generic clearance = 10mil, and 21 value(s) for objects]"
  J2 J9: Code=3518-006
J3 J4: library part "Jump 2 SMD", "Jumper, SMD", Rule="Clearance Constraint [Generic clearance = 10mil, and 10 value(s) for objects]"
J12: library part "CONN KF 3.81 2P", "KF-3.81-2-R Terminal Block Plug-in 3.81mm 2pin chan cong", Code=N/A
L1: library part "Inductor 0805 4.7uH 30mA", "4.7uH 0805 30mA", Code=1511-036
P1: library part "Header Code Nuvoton", "Header 6-5Pin"
P2 P3 P5: library part "HDRM 2x10 2.54", "HDR 2.54 MALE", Code="3504-027 * 0.25pcs"
P4 P6: library part "HDR 2.54 M 4 Pin", "HDR 2.54 MALE", Code="3504-028 * 0.1"
PW1 PW2 PW3: library part "LED 0805 RED", "LED 0805 SMD RED", Code=8600-017, Designed by=TranLuyen
Q1: library part MMBT3904, "Vce max: 40V, Ic max: 0.2A, P: 0.3W", Code=1701-065, Designed by=nhox
R1 R2 R9 R10 R12 R13 R17 R21 R36 R37 R48 R50: library part "Res 5.1k 0805", "Resistor SMD 0805", Code=1024-104
R3 R4 R5 R6 R7 R14 R18 R20 R22 R47 R59 R62: library part "Res 10k 0805", "Resistor SMD 0805", Code=1024-111
R8 R23: library part "Res 100R 0805", "Resistor SMD 0805", Code=1025-063
R11 R38: library part "Res 1.5K 0805", "Resistor SMD 0805", Code=1024-090
R15 R16 R19 R24 R27 R28 R39 R40 R41 R46 R49: library part "Res 33R 0805", "Resistor SMD 0805", Code=N/A
R25 R26 R42: library part "Res 4.7k 0805", "Resistor SMD 0805", Code=1024-103
R29 R30: library part "Res 2.2K 0805", "Resistor SMD 0805", Code=1024-094
R31: library part "Res 1M 0603", "Resistor SMD 0603", Code=1028-162
R52 R56: library part "Res 0805 300R", "Resistor SMD 0805"
U2: library part STM32103FRCT6, "STM32F103RCT6, LQFP64", Code=7203-028, Designed by=Nhox
U5: library part "CH340X MSOP-10", "USB to Serial Port Chip CH340", Code=N/A, Designed by=TranLuyen
V1 V2 V3 V4: library part "Screw Vit m2", "Screw Vit 2mm", Code=N/A
Y1 Y3: library part OSC_4_8MHz_5032, "CLOCK OSCILLATOR, Crystal 5032 5 x 3.2 x 0.8mm", Code=2506-033, Designed by=TranLuyen
Y2: library part "Crystal 32.768kHz 2x6mm", "32.768kHz ±20ppm D: 2.0mm x L: 6.0 mm", Code=2503-006
Y4: library part OSC_4_20MHz_5032, "CLOCK OSCILLATOR, Crystal 5032 5 x 3.2 x 0.8mm", Code=2506-022, Designed by=TranLuyen

## Via types
v1: diameter 27.56, hole 15.75, Top Layer to Bottom Layer, tented both sides, 195 vias
v2: diameter 43.31, hole 23.62, Top Layer to Bottom Layer, 32 vias
v3: diameter 24, hole 12, Top Layer to Bottom Layer, 9 vias
v4: diameter 11.81, hole 5.91, Top Layer to Bottom Layer, 1 vias

## Nets (pads, with @x,y where several pads share a name; then routed paths per layer and width w, separated by ;. In a path a pad name is that pad's centre, name@x,y a point inside that pad or via, vN(x,y) a via of type N, cw(c..) or ccw(c..) an arc to the next point about the centre after c; other vN are vias at no path point)
3.3V: C4.1 C5.1 C6.1 C7.1 C11.1 C12.2 C18.1 C19.2 C25.2 C26.2 C29.2 C30.2 C31.2 C32.2 C33.2 C34.2 C41.2 D4.1 IC1.2 IC1.4 IC2.2 IC2.4 P1.3 P4.4 P5.2 P5.4 P5.6 P5.8 P5.10 P5.12 P5.14 P5.16 P5.18 P5.20 Q1.3 R6.1 R9.2 R13.2 R17.1 R21.1 R22.2 R25.1 R26.1 R29.1 R30.1 R38.1 R42.1 R59.2 U1.1 U1.9 U1.24 U1.36 U1.48 U2.13 U2.19 U2.32 U2.48 U2.64 U3.2 U3.3 U3.20 U3.46 U3.55 U3.56 U5.10 | length 22802.5
  Top Layer w8: C34.2@1663.62,1683.62 1685,1683.62 ; U3.20@1875.85,1683.62 1685,1683.62 ; U3.3@2080.87,1794.16 2080.87,1839.13 2080,1840 ; U3.2@2096.62,1794.16 2096.62,1833.38 2090,1840 2080,1840 ; U3.46@2144.16,1604.88 2144.1,1604.82 2130.09,1604.82 2115,1589.73 2115,1555 2141.26,1528.74 2141.26,1518.74 v1(2145,1515) ; U3.55@2144.16,1746.62 2144.94,1746.62 2145,1746.68 U3.56@2145,1760 ; U3.56@2144.16,1762.36 2197.64,1762.36 2225,1735 2225,1618.07 2233.07,1610 C25.2@2260.63,1610 2268.83,1618.2 2268.83,1640.31 2273.51,1645 2410,1645 ; v1(2410,1550) 2410.63,1550.63 2410.63,1609.37 C26.2@2411.26,1610 C26.2@2410,1611.26 ; 1685,1683.62 1685,1805 1720,1840 2080,1840
  Top Layer w10: U1.36@669.29,814.96 669.29,692.91 685.82,676.39 969.28,676.39 976.38,669.29 C4.1@976.38,641.73 ; U1.24@728.34,1090.55 728.34,1104.72 728.05,1105.01 713.88,1105.01 704.72,1114.17 704.72,1141.73 736.53,1173.54 736.53,1189.28 C7.1@748.03,1200.79 ; U1.48@944.88,755.91 944.88,748.32 945.17,748.03 1007.87,748.03 1055.12,700.79 C5.1@1055.12,629.92 ; U1.9@1003.93,972.44 1003.8,972.56 973.39,972.56 953.82,992.13 901.57,992.13 881.89,972.44 881.89,830.71 897.64,814.96 U1.1@1003.93,814.96 1094.49,814.96 1133.86,775.59 C6.1@1133.86,629.92 ; C41.2@1226.38,1968.5 1232.96,1961.92 1232.96,1936.33 1269.9,1899.39 U5.10@1354.3,1899.39 ; C31.2@1850.39,452.76 1850.39,620.08 1929.13,698.82 2143.27,698.82 U2.48@2168.03,723.58 ; C29.2@2086.61,374.02 2149.61,374.02 2157.48,366.14 2157.48,322.83 2169.29,311.02 2358.27,311.02 2397.64,350.39 2397.64,385.39 U2.64@2376.82,406.21 ; U2.32@2485.39,932.37 2486.4,933.38 2486.4,934.56 2476.35,944.61 2476.35,978.39 2482.2,984.25 C30.2@2605.8,984.25 ; U2.13@2652.42,573.25 2690.24,535.43 2744.09,535.43 2755.13,546.46 2755.13,629.14 2787.4,661.42 2787.4,799.21 2803.15,814.96 C32.2@2854.33,814.96 v1(2854.33,862.2) 3259.84,862.2 3295.28,826.77 3295.28,322.83 3322.83,295.28 3767.72,295.28 3779.52,307.08 R42.1@3779.52,344.49 ; U2.19@2666.34,751.42 2666.34,751.91 2689.42,774.99 2689.42,811.47 2704.88,826.93 2704.88,960.09 2693.71,971.27 2690.57,974.41 C33.2@2687.01,974.41
  Top Layer w15: v1@708.42,1330.71 708.42,1218.11 717.2,1209.32 739.5,1209.32 C7.1@748.03,1200.79 ; v1(736.22,1330.71) 737.2,1329.72 864.17,1329.72 v1(865.16,1328.74) ; 818.9,462.6 R22.2@818.9,551.18 ; 826.77,1333.66 R13.2@826.77,1407.48 ; v1(918.31,1672.24) 918.8,1672.73 983.76,1672.73 R21.1@984.26,1673.23 ; C11.1@1013.78,1968.5 1013.78,2023.72 1025.5,2035.43 1226.38,2035.43 ; R9.2@1141.73,1279.53 1142.22,1280.02 1142.22,1329.23 v1(1142.72,1329.72) ; C41.2@1226.38,1968.5 1226.38,2035.43 ; R59.2@1485.63,1968.5 1485.63,2034.58 1486.48,2035.43 ; P1.3@1505.91,886.61 1570.08,886.61 1590.55,866.14 1590.55,305.12 1590.55,303.15 ; C34.2@1660,1683.62 1660,1890.25 ; v1@1730,1890 1729.75,1890.25 1660,1890.25 ; C26.2@2410,1611.26 2410,1645 v1(2410,1675) ; R30.1@2775.59,974.41 2775.59,996.06 2793.31,1013.78 2994.25,1013.78 2994.25,1013.63 3011.81,996.06 R29.1@3011.81,974.41 ; v1(3011.81,937.01) R29.1@3011.81,974.41 ; R38.1@3494.09,875.98 3483.35,886.72 3483.35,904.59 3466.69,921.26 3334.65,921.26 3297.24,958.67 3297.24,1005.91 3299.21,1007.87 ; R26.1@3657.49,1318.9 R25.1@3572.83,1318.89 3574.81,1316.92 3574.81,1181.1 3555.12,1161.42 3480.32,1161.42 3464.57,1145.67 3464.57,1071.96 3464.57,1027.56 3444.88,1007.87 3299.21,1007.87 ; 1226.38,2035.43 1486.48,2035.43 ; 1486.48,2035.43 1639.57,2035.43 1660,2015 1660,1890.25 ; R29.1@3011.81,974.41 3159.45,974.41 3192.91,1007.87 3299.21,1007.87
  Top Layer w20: R6.1@501.97,551.18 503.94,549.21 503.94,507.87 489.76,493.7 489.76,462.6 ; IC1.2@673.23,1919.29 IC1.4@901.57,1919.29 901.57,1931.26 938.82,1968.5 C11.1@1013.78,1968.5 C12.2@1013.78,1889.76 1014.76,1888.78 1014.76,1835.63 v1(1015.75,1834.65) v1(1015.75,1799.21) ; v1(696.85,1330.71) v1(736.22,1330.71) ; Q1.3@728.35,590.55 728.35,462.6 ; C4.1@976.38,641.73 988.19,629.92 C5.1@1055.12,629.92 C6.1@1133.86,629.92 1138.3,625.48 1169.39,625.48 1181.1,613.77 1181.1,480.32 1163.39,462.6 818.9,462.6 728.35,462.6 ; R21.1@984.26,1673.23 R17.1@1063,1673.23 ; 1161.42,285.43 1092.89,353.96 512.18,353.96 492.94,373.2 492.94,408.24 P4.4@489.76,411.42 489.76,462.6 ; 1429.13,305.12 1429.13,133.86 1496.06,66.93 P5.20@1639.37,66.93 ; 1692.91,305.12 1692.91,452.76 ; C31.2@1850.39,452.76 1692.91,452.76 ; D4.1@2620.08,1190.94 2530.94,1190.94 2496.06,1156.06 2496.06,1033.46 ; C33.2@2687.01,974.41 C30.2@2618.11,974.41 2615.48,974.41 2605.8,984.09 2605.8,984.25 2605.8,1002.06 2594.08,1013.78 2549.21,1013.78 2539.34,1023.65 2529.53,1033.46 2496.06,1033.46 ; C33.2@2696.85,974.41 R30.1@2775.59,974.41 ; 489.76,462.6 728.35,462.6 ; 1692.91,452.76 1692.91,994.09 1732.28,1033.46 2496.06,1033.46
  Top Layer w30: IC2.2@673.23,177.17 IC2.4@901.57,177.17 901.57,184.29 933.82,216.54 C18.1@1062.99,216.54 C19.2@1141.73,216.54 1141.73,265.75 1161.42,285.43 1181.1,305.12 1429.13,305.12 1590.55,305.12 1692.91,305.12 2066.93,305.12 2086.61,324.8 C29.2@2086.61,374.02
  Bottom Layer w8: v1(2145,1515) 2145,1540 2155,1550 v1@2415,1550
  Bottom Layer w15: 489.76,1673.23 917.32,1673.23 v1(918.31,1672.24) ; v1(865.16,1328.74) 867.56,1326.34 867.56,1309.6 881.89,1295.28 1133.93,1295.28 1142.72,1304.06 v1(1142.72,1329.72) ; v1@1015.26,1799.7 v1@1015.26,1835.14 ; v1(1729.89,1889.89) 1765.11,1889.89 1785,1870 1785,1813.79 1793.79,1805 2069.62,1805 2085,1789.62 2085,1690.1 2100.1,1675 v1(2410,1675) ; v1(2854.33,862.2) 2988.19,862.2 3011.81,885.83 v1(3011.81,937.01)
  Bottom Layer w20: P4.4@489.76,411.42 489.76,1330.71 ; v1(736.22,1330.71) v1(696.85,1330.71) 489.76,1330.71 ; v1(1015.75,1799.21) 539.37,1799.21 489.76,1749.61 489.76,1673.23 489.76,1330.71 ; P5.20@1639.37,68.9 P5.18@1739.37,68.9 P5.16@1839.37,68.9 P5.14@1939.37,68.9 P5.12@2039.37,68.9 P5.10@2139.37,68.9 P5.8@2239.37,68.9 P5.6@2339.37,68.9 P5.4@2439.37,68.9 P5.2@2539.37,68.9
5V: C8.1 C9.2 C10.2 C15.1 C16.2 C17.2 D1.2 F1.2 F2.2 F3.2 IC1.3 IC2.3 P1.1 P2.1 P2.3 P2.5 P2.7 P2.9 P2.11 P2.13 P2.15 P2.17 P2.19 PW1.1 PW2.1 PW3.1 | length 9732.1
  Top Layer w20: v1(385.83,1279.53) v1(429.13,1279.53) 430.58,1278.08 469.95,1278.08 472.44,1275.59 ; PW1.1@472.44,1102.36 F1.2@472.44,1181.1 472.44,1275.59 ; PW2.1@472.44,1643.7 472.44,1710.13 F3.2@472.44,1719.81 ; IC1.3@673.23,1828.74 671.26,1826.77 578.74,1826.77 559.06,1846.46 559.06,1946.95 547.34,1958.66 C10.2@472.44,1958.66 C9.2@472.44,1879.92 C8.1@472.44,1801.18 F3.2@472.44,1722.44 F3.2@472.44,1719.81 ; P1.1@1505.91,1086.61 1594.49,1086.61 1625.98,1055.12 v1(1625.98,492.13) v1(1625.98,441.55) ; P2.19@2688.98,2019.29 P2.17@2788.98,2019.29 P2.15@2888.98,2019.29 P2.13@2988.98,2019.29 P2.11@3088.98,2019.29 P2.9@3188.98,2019.29 P2.7@3288.98,2019.29 P2.5@3388.98,2019.29 P2.3@3488.98,2019.29 3538.98,2019.29 ; PW3.1@3267.72,1190.94 F2.2@3336.61,1190.94 3336.61,1336.61 3358.27,1358.27 3405.51,1358.27 3421.26,1374.02 3421.26,1775.59 3444.88,1799.21 3507.87,1799.21 3538.98,1830.32 3538.98,2019.29 ; P2.1@3588.98,2019.29 3538.98,2019.29 ; 472.44,1275.59 472.44,1308.28 484.16,1320 515.06,1320 543.31,1348.25 543.31,1698.41 531.59,1710.13 482.13,1710.13 F3.2@472.44,1719.81
  Top Layer w30: D1.2@366.14,66.93 v1(366.14,125.98) v1(366.14,157.48) ; v1(531.5,307.09) v1(562.99,307.09) 562.99,94.49 C17.2@559.06,90.55 561.02,88.58 671.26,88.58 IC2.3@673.23,86.61
  Bottom Layer w20: v1(385.83,1279.53) v1(429.13,1279.53) 429.13,307.09 ; v1(562.99,307.09) 622.05,248.03 1523.62,248.03 1625.98,350.39 v1(1625.98,441.55) v1(1625.98,492.13) ; P1.1@1505.91,1086.61 1590.55,1086.61 1625.98,1051.18 1625.98,834.65 1669.29,791.34 1917.32,791.34 2011.81,885.83 2011.81,1161.42 2051.18,1200.79 2496.06,1200.79 2614.17,1318.9 2614.17,2001.72 2631.75,2019.29 P2.19@2688.98,2019.29
  Bottom Layer w30: v1(366.14,125.98) v1(366.14,157.48) 366.14,263.78 409.45,307.09 429.13,307.09 v1(531.5,307.09) v1(562.99,307.09)
A0: A0.2 R25.2 U2.14 | length 1743.3
  Top Layer w10: v1(2625.98,625.98) 2627.03,625.98 2665.85,587.17 U2.14@2666.34,587.17 ; R25.2@3494.09,1318.89 3492.13,1320.86 3492.13,1401.57 3498.03,1407.48 A0.2@3533.46,1407.48 3535.43,1409.45 v1(3535.43,1464.57)
  Bottom Layer w10: v1(2625.98,625.98) 2661.42,661.42 3150.3,661.42 3535.43,1046.56 v1(3535.43,1464.57)
A1: A1.2 R26.2 U2.15 | length 1750.2
  Top Layer w10: U2.15@2680.26,601.09 2680.75,601.09 2711.55,570.29 2724.99,570.29 v1(2728.35,566.93) ; v1(3692.91,1464.57) A1.2@3692.91,1407.48 3726.38,1407.48 3736.23,1397.63 R26.2@3736.23,1318.9
  Bottom Layer w10: v1(2728.35,566.93) 2802.18,640.76 3156.51,640.76 3555.12,1039.37 3555.12,1326.77 v1(3692.91,1464.57)
A2: P3.1 U2.16 | length 1358.4
  Top Layer w10: U2.16@2694.18,615.01 2696.53,612.66 2697.71,612.66 v1(2716.54,631.48)
  Bottom Layer w10: v1(2716.54,631.48) 2716.54,630.95 2692.91,607.33 2692.91,445.37 2709.84,428.45 3551.87,428.45 3566.14,414.17 P3.1@3566.14,168.9
A3: P6.2 U2.17 | length 2063.9
  Top Layer w10: U2.17@2694.18,723.58 2695.34,724.74 2696.52,724.74 v1(2712.6,708.66)
  Bottom Layer w10: v1(2712.6,708.66) 2717.35,708.66 2733.1,724.41 3070.87,724.41 3402.98,1056.52 3402.98,1468.04 3495.37,1560.43 3702.76,1560.43 3724.41,1538.78 3724.41,1267.72 3744.84,1247.28 3860.2,1247.28 P6.2@3866.14,1241.34
A4: P6.3 U2.20 | length 2178.5
  Top Layer w10: v1(2582.68,710.47) 2585.59,713.38 2600.47,713.38 U2.20@2652.42,765.34
  Bottom Layer w10: v1(2582.68,710.47) 2584.49,708.66 2623.59,708.66 2658.33,743.41 3063,743.41 3383.98,1064.39 3383.98,1475.91 3487.5,1579.43 3727.66,1579.43 3767.72,1539.37 3767.72,1366.14 3792.52,1341.34 P6.3@3866.14,1341.34
A5: P6.4 U2.21 | length 2086.5
  Top Layer w10: v1(2582.68,748.03) 2586.04,751.39 2610.15,751.39 2638.01,779.25 U2.21@2638.5,779.25
  Bottom Layer w10: v1(2582.68,748.03) 2614.17,748.03 2628.55,762.41 3055.13,762.41 3364.98,1072.26 3364.98,1483.78 3479.63,1598.43 3838.58,1598.43 3866.14,1570.87 P6.4@3866.14,1441.34
A6: A6.2 U2.22 | length 438.9
  Top Layer w10: U2.22@2624.58,793.17 2678.1,846.69 2678.1,900.64 v1(2677.17,901.57) ; v1(2933.07,937.01) A6.2@2933.07,974.41
  Bottom Layer w10: v1(2677.17,901.57) 2680.43,904.84 2900.9,904.84 v1(2933.07,937.01)
A7: A7.2 U2.23 | length 376.6
  Top Layer w10: U2.23@2610.66,807.09 2640.54,836.97 2640.54,898.83 v1(2637.8,901.57) ; v1(2854.33,937.01) A7.2@2854.33,974.41
  Bottom Layer w10: v1(2637.8,901.57) 2673.23,937.01 v1(2854.33,937.01)
A8: P5.13 U2.41 | length 963.3
  Top Layer w10: U2.41@2265.46,821.01 2265.95,821.01 2312.19,774.77 v1(2314,774.77)
  Bottom Layer w10: P5.13@1939.37,168.9 1939.37,290.45 1948.82,299.9 1977.06,299.9 2018.32,341.15 2018.32,680.42 2112.7,774.81 v1(2314,774.77) v1(2314,774.77)
A9: R46.2 U2.42 | length 1917.1
  Top Layer w10: R46.2@905.51,1486.23 v1(905.51,1531.5) ; v1(1830.71,885.83) 1847.64,868.89 2189.74,868.89 U2.42@2251.54,807.09
  Bottom Layer w10: v1(905.51,1531.5) 908.87,1528.14 908.87,1512.92 921.79,1500 1586.61,1500 1830.71,1255.91 v1(1830.71,885.83)
A10: R39.1 U2.43 | length 1746.9
  Top Layer w10: R39.1@1141.74,1486.22 v1(1141.73,1535.43) ; v1(1830.71,846.46) 1832.39,848.14 2182.65,848.14 U2.43@2237.62,793.17
  Bottom Layer w10: v1(1141.73,1535.43) 1586.65,1535.43 1857.49,1264.59 1857.49,855.93 1849.71,848.16 1832.41,848.16 v1(1830.71,846.46)